# Altium PCB MiniDisplay.PcbDoc (part 1 of 2)
Units mil, origin at the board's own origin, x right, y up, seen from the top; angles counter-clockwise.
Board outline 1645.04 x 1210.04 mil, 2 copper layers (Top1, Bottom2), stack 42.17 mil thick; 71 components, 72 nets, 363 pads, 233 vias.
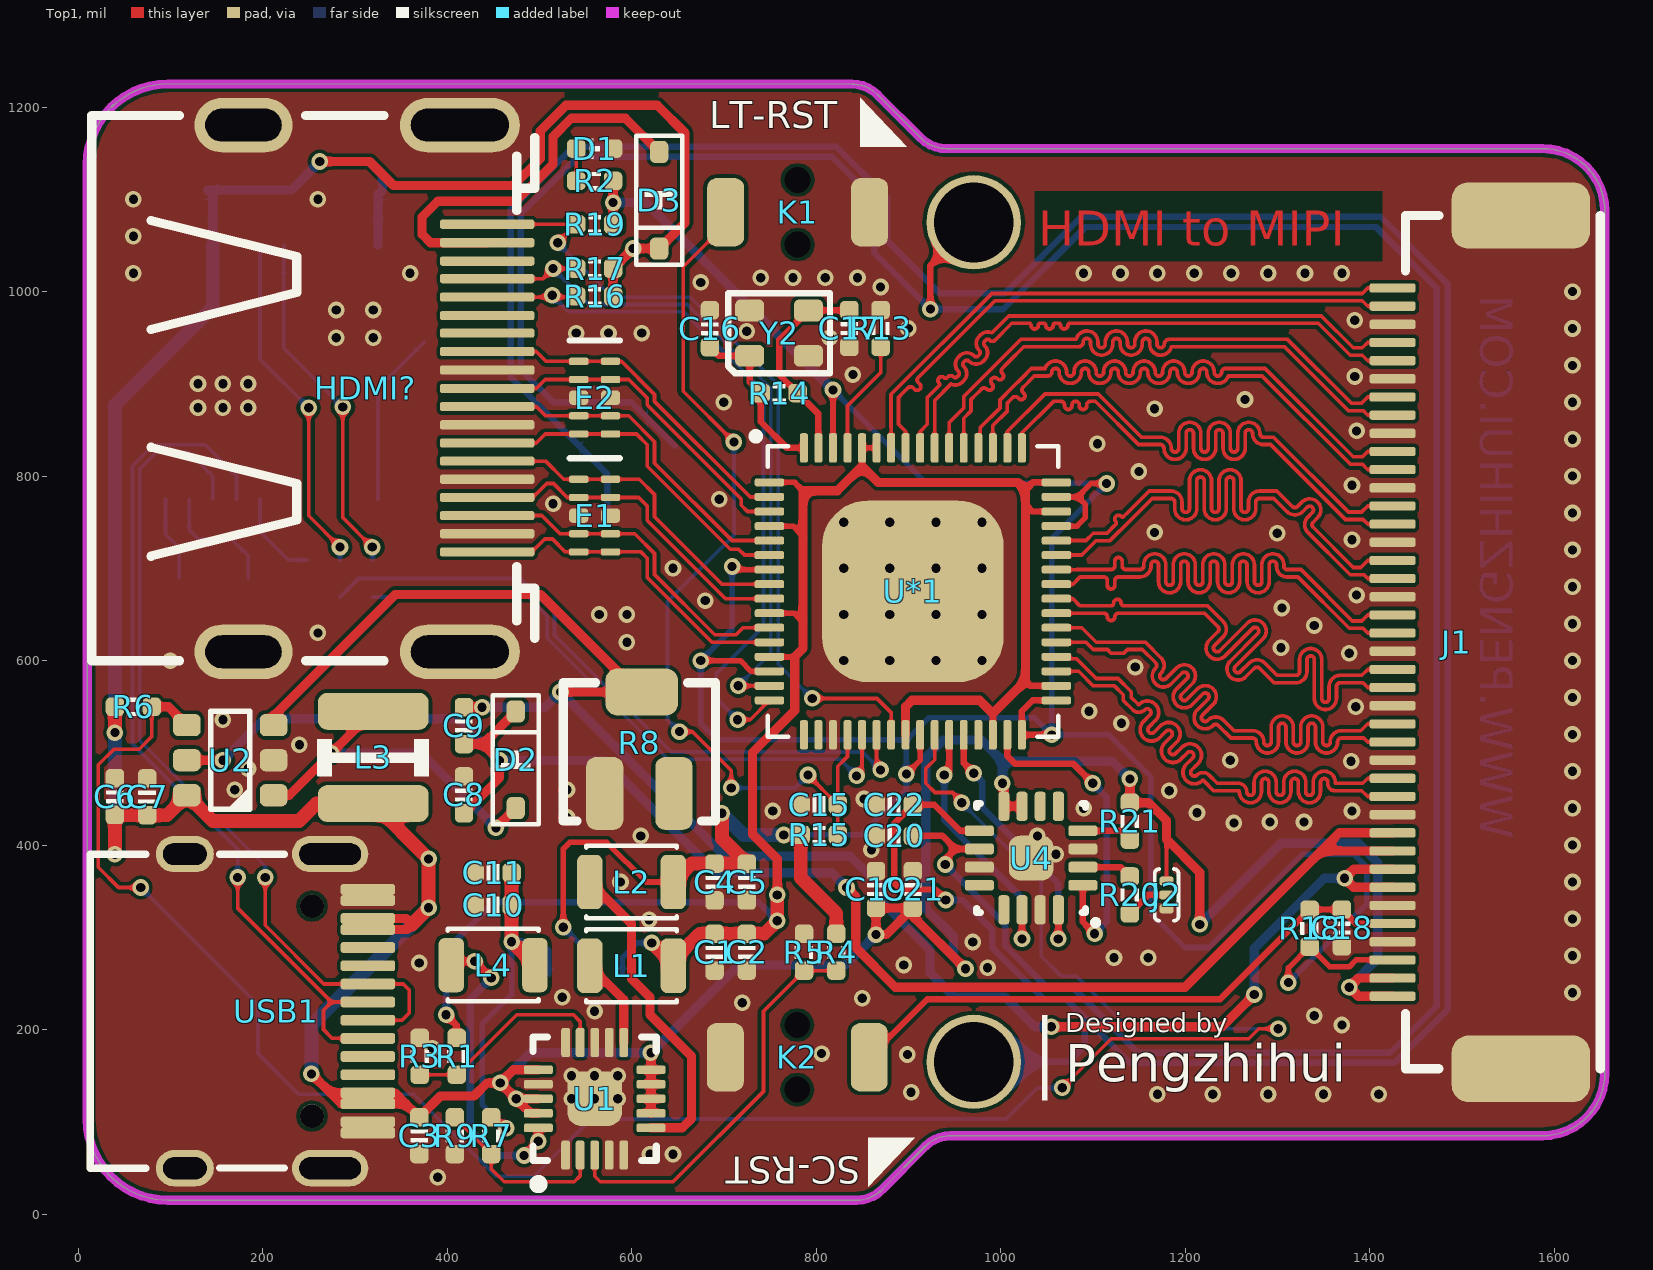
[diagram p0: Top1 view]
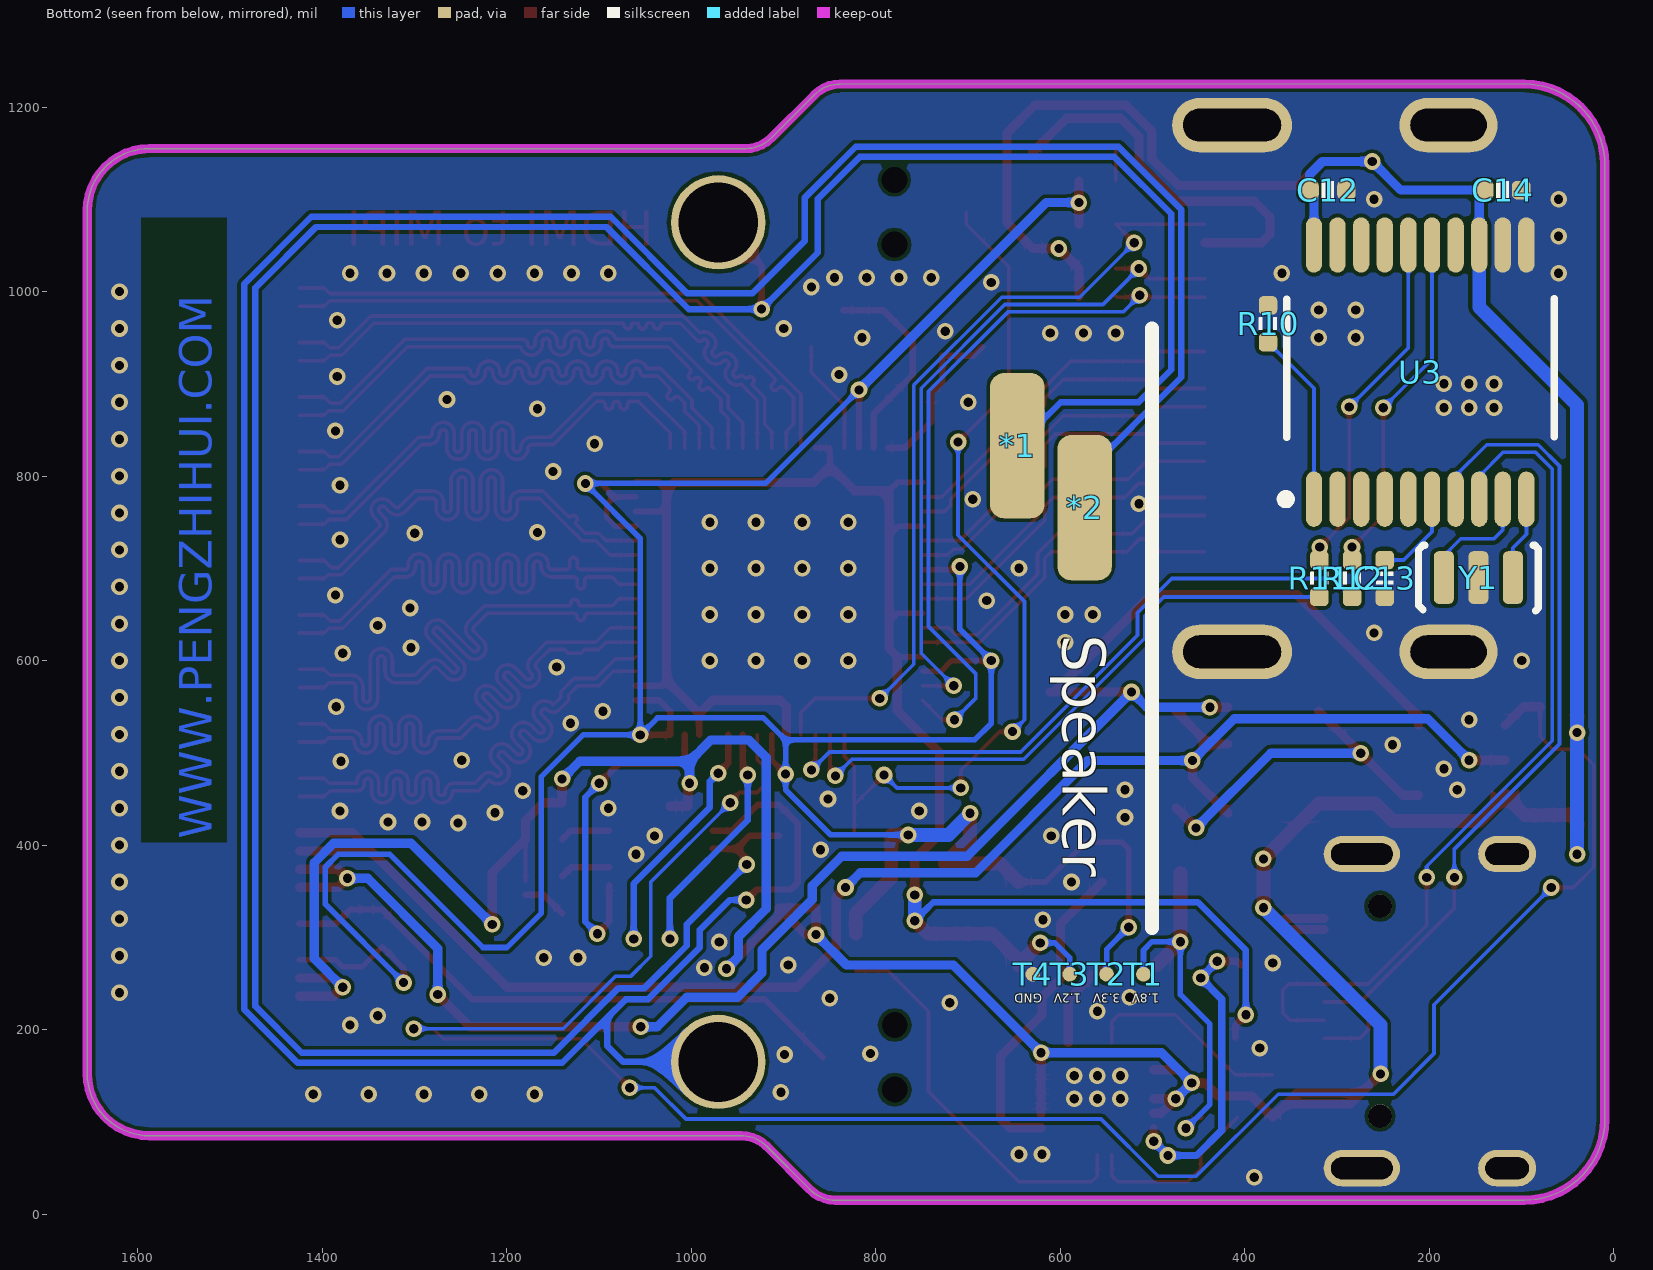
[diagram p1: Bottom2 view, seen from below]
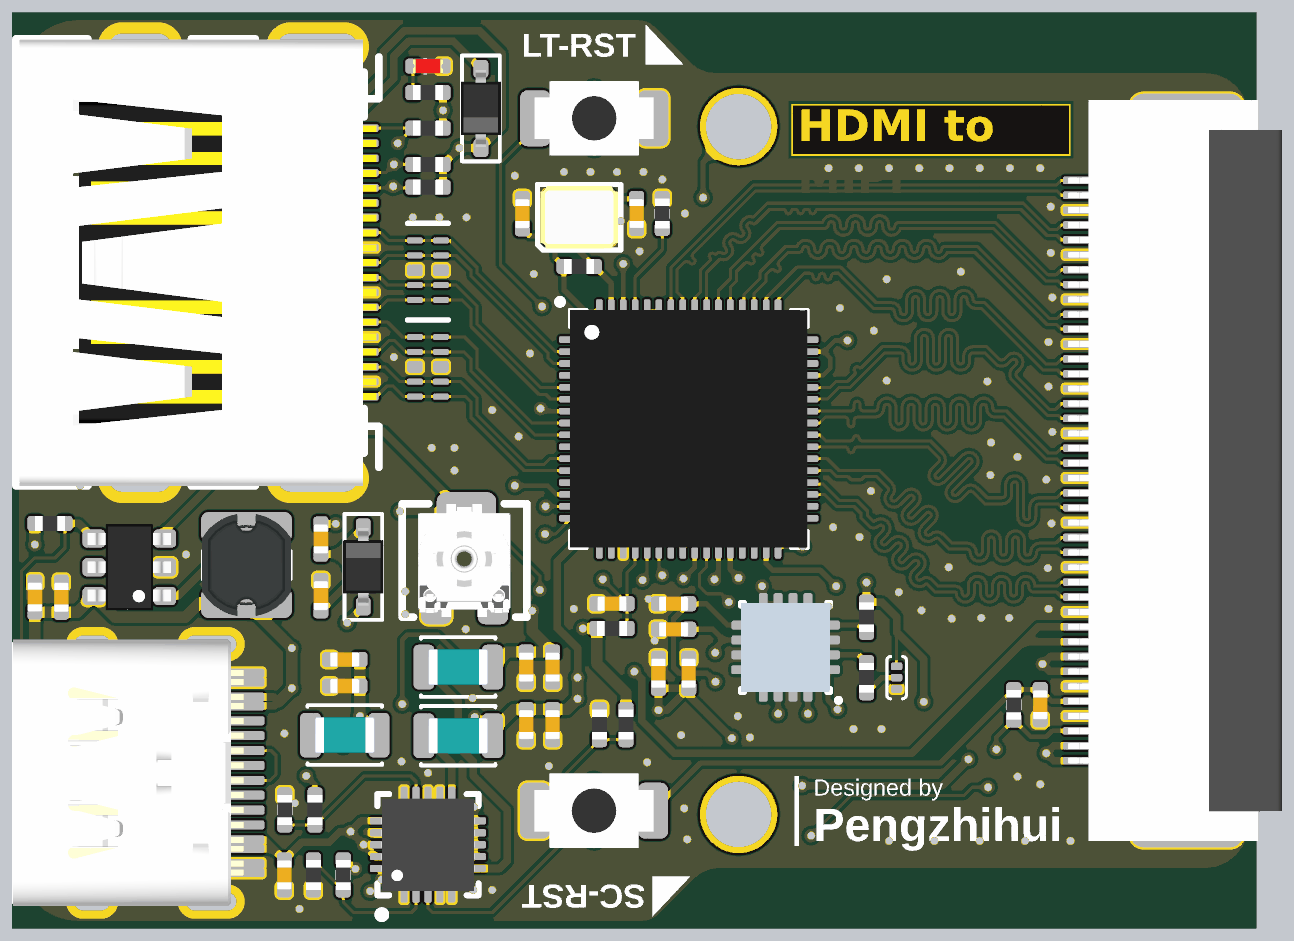
[diagram p3: 3D render of the assembled board from above, using the file's embedded part models]
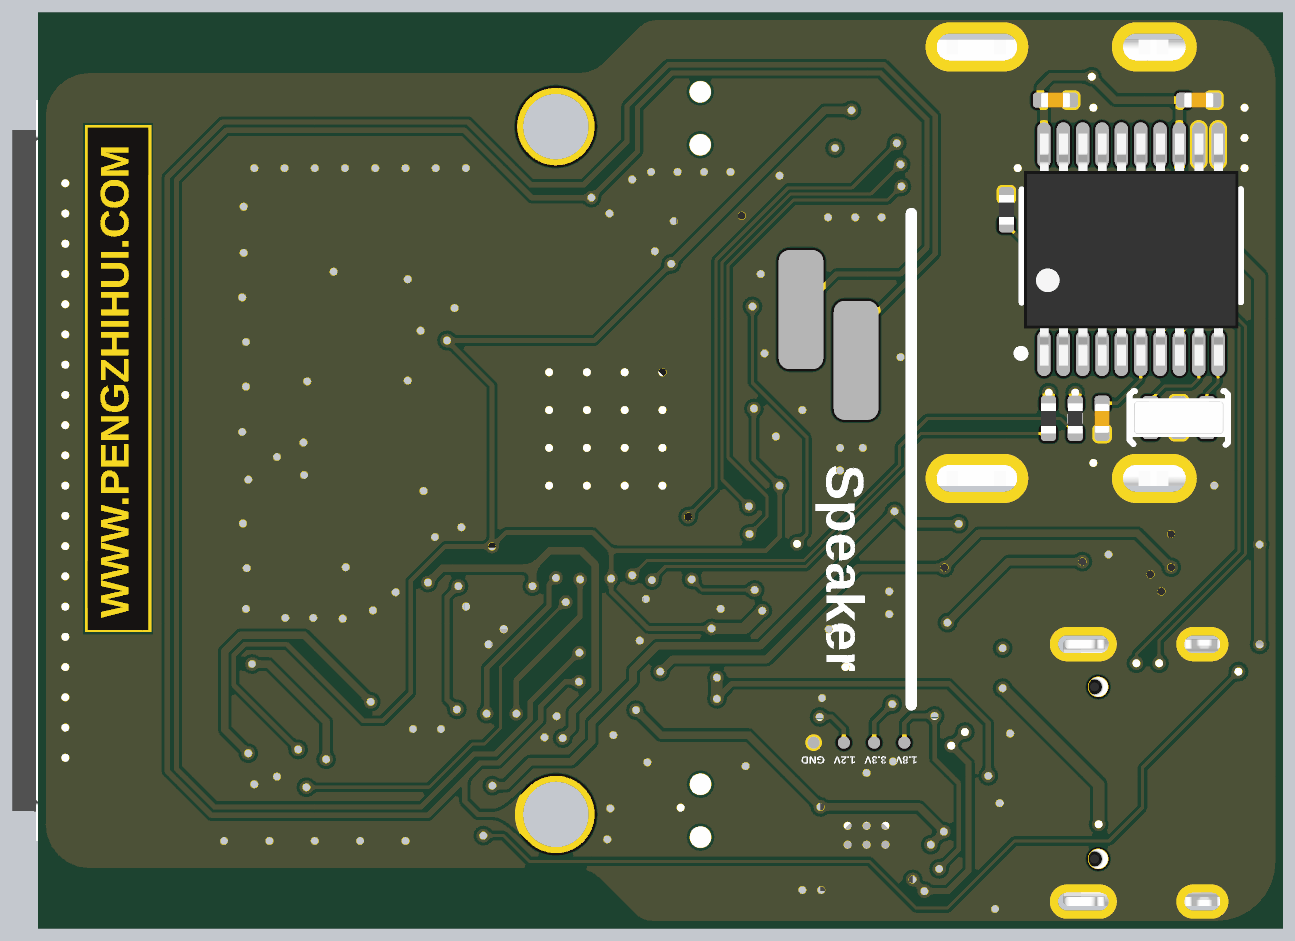
[diagram p4: 3D render of the assembled board from below, using the file's embedded part models]

## Layer stack, top to bottom
Top Solder: solder mask 0.4, Solder Resist, Dk 3.5
Top1: signal copper 1.4
Dielectric1: core 39.3701, FR-4, Dk 4.2
Bottom2: signal copper 1.4
Bottom Solder: solder mask 0.4, Solder Resist, Dk 3.5

## Board outline
9.96,102.54 ccw(c97.5,102.54) 97.5,15 843.73,15.04 ccw(c843.73,54.41) 871.57,26.57 918.47,73.47 cw(c946.31,45.63) 946.31,85 1587.57,84.97 ccw(c1587.57,152.4) 1655,152.4 1655,1087.63 ccw(c1587.66,1087.63) 1587.66,1154.97 941.31,1155 cw(c941.31,1194.37) 913.47,1166.53 866.53,1213.47 ccw(c838.69,1185.63) 838.69,1225 97.5,1225.04 ccw(c97.5,1137.5) 9.96,1137.5

## Design rules (kind name [scope] priority, off if disabled: settings)
Clearance [All] p1: gap=4 ignorepadtopadclearanceinfootprint=FALSE except(0: Arc-Hole Track-Hole SMDPad-Hole THPad-Hole Via-Hole Fill-Hole Poly-Hole Region-Hole Text-Hole)
ComponentClearance [All] p1: gap=0 collisioncheckmode=3 verticalgap=0 showdistances=FALSE
DiffPairsRouting [All] p1: maxlimit=9 minlimit=4 mostfreqgap=4 toplayer_minwidth=4 toplayer_maxwidth=15 toplayer_prefwidth=4 bottomlayer_minwidth=4 bottomlayer_maxwidth=15 bottomlayer_prefwidth=4 maxuncoupledlength=500
FanoutControl Fanout_BGA [All] p1: bgadir=Out bgaviamode=Centered fanoutstyle=Auto fanoutdirection=Alternating viagrid=1 // Fanout_BGA (Default Rule)
HoleSize [All] p1: absolutevalues=TRUE maxlimit=10000 minlimit=8 maxpercent=80.000 minpercent=20.000
MinimumSolderMaskSliver [All] p1 off: minsoldermaskwidth=2
PlaneClearance [All] p1: clearance=8
PlaneConnect [All] p1: planeconnectstyle=Direct reliefexpansion=20 reliefentries=4 reliefconductorwidth=10 reliefairgap=10
PolygonConnect [All] p1: connectstyle=Direct reliefconductorwidth=10 reliefentries=4 polygonreliefangle="90 Angle" airgapwidth=10
RoutingVias [All] p1: holewidth=8 width=16 viastyle="Through Hole" minholewidth=6 minwidth=12 maxholewidth=28 maxwidth=50
SilkToSilkClearance [All] p1: silktosilkclearance=0
SilkToSolderMaskClearance [IsPad] p1: minsilkscreentomaskgap=0 clearancetoexposedcopper=TRUE
SolderMaskExpansion [All] p1: expansion=3
Width GND [(InNet('AGND') OR InNet('GND'))] p1: maxlimit=50 minlimit=4 preferedwidth=10
Width VCC [(InNet('VDD_SYS_3.3V') OR InNet('VDD_AV_3.3V') OR InNet('VDD_5V') OR InNet('VDD1V2-SYS') OR InNet('VDD1V1-EPHY') OR InNet('VDD-CPUX') OR InNet('NetC15_2') OR InNet('NetC9_2') OR InNet('NetC12_2'))] p2: maxlimit=50 minlimit=4 preferedwidth=10
Width [All] p3: maxlimit=10000 minlimit=4 preferedwidth=4
21 further rules are at their usual default settings.

## Classes and differential pairs
component class U_Audio: *1 *2 C19 C20 C21 C22 J2 R20 R21 U4
net class MIPI: MIPI0_D0_N MIPI0_D0_P MIPI0_D1_N MIPI0_D1_P MIPI0_D2_N MIPI0_D2_P MIPI0_D3_N MIPI0_D3_P MIPI0_DC_N MIPI0_DC_P MIPI1_D0_N MIPI1_D0_P MIPI1_D1_N MIPI1_D1_P MIPI1_D2_N MIPI1_D2_P MIPI1_D3_N MIPI1_D3_P MIPI1_DC_N MIPI1_DC_P
net class HDMI: HDMIC_N HDMIC_P HDMID0_N HDMID0_P HDMID1_N HDMID1_P HDMID2_N HDMID2_P
component class U_Connector: C18 D3 E1 E2 HDMI? J1 R16 R17 R18 R19
component class LT6911C: C15 C16 C17 R13 R14 R15 U*1 Y2
component class Main: C1 C2 C3 C4 C5 C6 C7 C8 C9 C10 C11 C12 C13 C14 D1 D2 K1 K2 L1 L2 L3 L4 R1 R2 R3 R4 R5 R6 R7 R8 R9 R10 R11 R12 T1 T2 T3 T4 U1 U2 U3 USB1 Y1
differential pair MIPI1_DC: +MIPI1_DC_P -MIPI1_DC_N
differential pair MIPI1_D3: +MIPI1_D3_P -MIPI1_D3_N
differential pair MIPI1_D2: +MIPI1_D2_P -MIPI1_D2_N
differential pair MIPI1_D1: +MIPI1_D1_P -MIPI1_D1_N
differential pair MIPI1_D0: +MIPI1_D0_P -MIPI1_D0_N
differential pair MIPI0_DC: +MIPI0_DC_P -MIPI0_DC_N
differential pair MIPI0_D3: +MIPI0_D3_P -MIPI0_D3_N
differential pair MIPI0_D2: +MIPI0_D2_P -MIPI0_D2_N
differential pair MIPI0_D1: +MIPI0_D1_P -MIPI0_D1_N
differential pair MIPI0_D0: +MIPI0_D0_P -MIPI0_D0_N
differential pair HDMID2: +HDMID2_P -HDMID2_N
differential pair HDMID1: +HDMID1_P -HDMID1_N
differential pair HDMID0: +HDMID0_P -HDMID0_N
differential pair HDMIC: +HDMIC_P -HDMIC_N

## Components (designator, comment, footprint, x,y, rotation, side; value= is the part's Value field where it differs from the comment)
*1 "SPEAKER" SPEAKER 646.75,832.97 r180 bottom
*2 "SPEAKER" SPEAKER 573.9,765.8 r180 bottom
C1 "10uF" CAP_0402 690,283.9 r270 top value=0.1u
C2 "0.1uF" CAP_0402 725,283.9 r270 top value=0.1u
C3 "10uF" CAP_0402 370,85 r90 top value=0.1u
C4 "10uF" CAP_0402 690,360 r270 top value=0.1u
C5 "0.1uF" CAP_0402 725,360 r270 top value=0.1u
C6 "10uF" CAP_0402 40,452.68 r270 top value=0.1u
C7 "0.1uF" CAP_0402 75,452.36 r270 top value=0.1u
C8 "10uF" CAP_0402 418.38,454.5 r270 top value=0.1u
C9 "0.1uF" CAP_0402 418.38,529.5 r270 top value=0.1u
C10 "10uF" CAP_0402 450,335 r180 top value=0.1u
C11 "0.1uF" CAP_0402 450,370 r180 top value=0.1u
C12 "0.1uF" CAP_0402 310,1110 r180 bottom value=0.1u
C13 "10nF" CAP_0402 248.4,689 r270 bottom value=0.1u
C14 "0.1uF" CAP_0402 120.51,1110 r180 bottom value=0.1u
C15 "10uF" CAP_0402 803.5,443.8 r0 top value=0.1u
C16 "18pF" CAP_0402 685,959.8 r270 top value=0.1u
C17 "18pF" CAP_0402 836.1,960 r90 top value=0.1u
C18 "10uF" CAP_0402 1370,310.2 r90 top value=0.1u
C19 "10uF" CAP_0402 865,351.89 r270 top value=0.1u
C20 "220pF" CAP_0402 885,410 r180 top value=0.1u
C21 "0.1uF" CAP_0402 905,351.89 r270 top value=0.1u
C22 "220pF" CAP_0402 885,443.8 r180 top value=0.1u
D1 "color?" LED_0402_RED 560,1155 r0 top
D2 "二极管-5B5817WS" SOD-323 474.5,492.5 r90 top
D3 "二极管-5B5817WS" SOD-323 630,1099 r270 top
E1 "E?" DFN-2510 560,757.2 r270 top
E2 "E?" DFN-2510 560,885 r270 top
HDMI? "HDMI-SWM-19" HDMI-SWM-19 225,895 r90 top
J1 "0.5S_A_40PWB" FFC_0.5_40 1485,620 r90 top locked
J2 "Def-0" jumper-3 1180,346 r90 top
K1 "TACT 2P" ButtonTACT_3x4x2_180H 780,1086 r180 top value=3x4
K2 "TACT 2P" ButtonTACT_3x4x2_180H 779.69,170 r180 top value=3x4
L1 "2.2uH" 2520-L 600,269.21 r0 top
L2 "2.2uH" 2520-L 600,360 r0 top
L3 "CD32" IND_CD32 320,495 r90 top value=22uH
L4 "2.2uH" 2520-L 450,270 r0 top
R1 "100K" RES_0402 410.5,171.02 r90 top value=22R
R2 "1K" RES_0402 560,1120 r180 top value=22R
R3 "100K" RES_0402 370.5,171.02 r270 top value=22R
R4 "510K" RES_0402 822,283.9 r90 top value=22R
R5 "110K" RES_0402 787,283.9 r270 top value=22R
R6 "33K" RES_0402 60,550 r180 top value=22R
R7 "200K" RES_0402 448,85 r90 top value=22R
R8 "电位器-贴片" "贴片电位器 3*3" 616,526 r90 top
R9 "100K" RES_0402 408.5,85 r90 top value=22R
R10 "2K" RES_0402 375,965 r270 bottom value=22R
R11 "22R" RES_0402 319.4,689 r270 bottom
R12 "22R" RES_0402 283.9,689 r270 bottom
R13 "7.68K" RES_0402 870,960 r270 top value=22R
R14 "1M" RES_0402 760,890 r0 top value=22R
R15 "10K" RES_0402 803.5,411.12 r180 top value=22R
R16 "47K" RES_0402 560,995 r0 top value=22R
R17 "47K" RES_0402 560,1025 r0 top value=22R
R18 "10K" RES_0402 1335,310 r270 top value=22R
R19 "2.2K" RES_0402 560,1073 r180 top value=22R
R20 "0R" RES_0402 1140.23,346 r90 top value=22R
R21 "1M" RES_0402 1140.23,426 r270 top value=22R
T1 "测试点" TEST_PT 510,259.99 r180 bottom
T2 "测试点" TEST_PT 550,260 r180 bottom
T3 "测试点" TEST_PT 590,260 r180 bottom
T4 "测试点" TEST_PT 630,260 r180 bottom
U1 "EA3036" QFN-20 560,125 r90 top
U2 "RT9293" SOT23-6 165,492.05 r180 top
U3 "CH341T" SSOP-20 209.8,917.2 r90 bottom locked
U4 "MAX98357AETE" TQFN-16 1033.13,386 r180 top
U*1 "LT6911C" QFN-64-0.4mm 905,675 r0 top locked
USB1 "Type-C" Type-C-TOP 215,220 r180 top
Y1 "12MHz" 晶振-3P 147,690 r0 bottom
Y2 "27MHz" 晶振2520 760,955 r0 top

## Footprints (in the part's own frame and the unit in brackets; to place one, negate y for a bottom-side part, rotate by r counter-clockwise, add the part's x,y. Pads: shape width x height; smd on the part's side, far side on the other; paste and mask are expansions set on the pad)
2520-L [mm]
  rrect50% 0.7x1.5 smd: 1(-1.15,0) 2(1.15,0)
  silkscreen extent -1.25,-1 1.25,1, body extent -1,-0.6 1,0.6, height 0.92
ButtonTACT_3x4x2_180H [mil]
  round 0 hole 28: 0(0,35) 0(0,-35)
  rrect50% 40x74 smd: 1(-78,0) 2(78,0)
  body extent -79,-49 79,49, height 63
CAP_0402 [mil]
  rrect50% 20x20 smd: 1(-20,0) 2(20,0)
  silkscreen extent -7,-9 7,9, body extent -20,-10 20,10, height 20
DFN-2510 [mm]
  rrect50% 0.2x0.525 smd: 1(-1,-0.437) 2(-0.5,-0.437) 4(0.5,-0.437) 5(1,-0.437) 6(1,0.437) 7(0.5,0.437) 9(-0.5,0.437) 10(-1,0.437)
  rrect50% 0.4x0.525 smd: 3(0,-0.437) 8(0,0.437)
  silkscreen extent -1.57,-0.69 -1.57,0.69
FFC_0.5_40 [mil]
  rrect50% 72x150 smd: 0(-462.48,-78.98) 0(462.48,-78.98)
  rrect50% 10x50 smd: 1(-383.86,60) 2(-364.17,60) 3(-344.49,60) 4(-324.8,60) 5(-305.12,60) 6(-285.43,60) 7(-265.75,60) 8(-246.06,60) 9(-226.38,60) 10(-206.69,60) 11(-187.01,60) 12(-167.32,60) 13(-147.64,60) 14(-127.95,60) 15(-108.27,60) 16(-88.58,60) 17(-68.9,60) 18(-49.21,60) 19(-29.53,60) 20(-9.84,60) 21(9.84,60) 22(29.53,60) 23(49.21,60) 24(68.9,60) 25(88.58,60) 26(108.27,60) 27(127.95,60) 28(147.64,60) 29(167.32,60) 30(187.01,60) 31(206.69,60) 32(226.38,60) 33(246.06,60) 34(265.75,60) 35(285.43,60) 36(305.12,60) 37(324.8,60) 38(344.49,60) 39(364.17,60) 40(383.86,60)
  silkscreen extent -462,-165 462,46, body extent -490,-205 490,78, height 99
HDMI-SWM-19 [mm] "HDMI-SWM-19"
  rrect50% 0.254x2.6 smd: 1(-4.5,-5.55) 2(-4,-5.55) 3(-3.5,-5.55) 4(-3,-5.55) 5(-2.5,-5.55) 6(-2,-5.55) 7(-1.5,-5.55) 8(-1,-5.55) 9(-0.5,-5.55) 10(0,-5.55) 11(0.508,-5.55) 12(1.016,-5.55) 13(1.524,-5.55) 14(2.007,-5.55) 15(2.515,-5.55) 16(3.023,-5.55) 17(3.505,-5.55) 18(4.013,-5.55) 19(4.521,-5.55)
  oval 1.5x2.7 hole 2.1 slot 0.9 at 0 deg: SH1(-7.25,1.16) SH2(7.25,1.16)
  oval 1.5x3.3 hole 2.7 slot 0.9 at 0 deg: SH3(-7.25,-4.8) SH4(7.25,-4.8)
  silkscreen extent -7.5,-6.86 7.52,5.33, body extent -7.5,-6.78 7.5,5.22, height 6.14
IND_CD32 [mil]
  rrect50% 40x120 smd: 1(-50,0) 2(50,0)
  silkscreen extent -20,-60 20,60, body extent -68,-59 68,59, height 83
jumper-3 [mil] "选择焊盘"
  rrect50% 10x15 smd: 1(-15,0) 2(0,0) 3(15,0)
  silkscreen extent -28,-13 28,13
LED_0402_RED [mil]
  rrect50% 20x20 smd: 1(-20,0) 2(20,0)
  silkscreen extent -6,-10 6,10, body extent -20,-10 20,10, height 18
QFN-20 [mm] "QFN, 20-Leads, Body 3.00x3.00mm, Pitch 0.40mm, Thermal Pad 1.65x1.65mm, IPC Medium Density"
  rrect50% 0.8x0.24 smd: 1(-1.55,0.8) 2(-1.55,0.4) 3(-1.55,0) 4(-1.55,-0.4) 5(-1.55,-0.8) 11(1.55,-0.8) 12(1.55,-0.4) 13(1.55,0) 14(1.55,0.4) 15(1.55,0.8)
  rrect50% 0.24x0.8 smd: 6(-0.8,-1.55) 7(-0.4,-1.55) 8(0,-1.55) 9(0.4,-1.55) 10(0.8,-1.55) 16(0.8,1.55) 17(0.4,1.55) 18(0,1.55) 19(-0.4,1.55) 20(-0.8,1.55)
  rrect50% 1.5x1.5 smd: 21(0,0)
  silkscreen extent -2.47,-1.7 1.7,1.7, body extent -1.56,-1.56 1.56,1.56, height 0.8
QFN-64-0.4mm [mm]
  rrect50% 0.81x0.22 smd: 1(-3.95,3) 2(-3.95,2.6) 3(-3.95,2.2) 4(-3.95,1.8) 5(-3.95,1.4) 6(-3.95,1) 7(-3.95,0.6) 8(-3.95,0.2) 9(-3.95,-0.2) 10(-3.95,-0.6) 11(-3.95,-1) 12(-3.95,-1.4) 13(-3.95,-1.8) 14(-3.95,-2.2) 15(-3.95,-2.6) 16(-3.95,-3) 33(3.95,-3) 34(3.95,-2.6) 35(3.95,-2.2) 36(3.95,-1.8) 37(3.95,-1.4) 38(3.95,-1) 39(3.95,-0.6) 40(3.95,-0.2) 41(3.95,0.2) 42(3.95,0.6) 43(3.95,1) 44(3.95,1.4) 45(3.95,1.8) 46(3.95,2.2) 47(3.95,2.6) 48(3.95,3)
  rrect50% 0.22x0.81 smd: 17(-3,-3.95) 18(-2.6,-3.95) 19(-2.2,-3.95) 20(-1.8,-3.95) 21(-1.4,-3.95) 22(-1,-3.95) 23(-0.6,-3.95) 24(-0.2,-3.95) 25(0.2,-3.95) 26(0.6,-3.95) 27(1,-3.95) 28(1.4,-3.95) 29(1.8,-3.95) 30(2.2,-3.95) 31(2.6,-3.95) 32(3,-3.95) 49(3,3.95) 50(2.6,3.95) 51(2.2,3.95) 52(1.8,3.95) 53(1.4,3.95) 54(1,3.95) 55(0.6,3.95) 56(0.2,3.95) 57(-0.2,3.95) 58(-0.6,3.95) 59(-1,3.95) 60(-1.4,3.95) 61(-1.8,3.95) 62(-2.2,3.95) 63(-2.6,3.95) 64(-3,3.95)
  rrect50% 5x5 smd paste-4: 65(0,0)
  silkscreen extent -4.42,-4 4,4.37, body extent -4,-4 4,4, height 0.81
RES_0402 [mil]
  rrect50% 20x20 smd: 1(-20,0) 2(20,0)
  silkscreen extent -7,-10 7,10, body extent -20,-10 20,10, height 14
SOD-323 [mm]
  rrect50% 0.6x0.5 smd: 1(-1.329,0) 2(1.329,0)
  silkscreen extent -1.78,-0.64 1.78,0.64, body extent -1.3,-0.68 1.3,0.67, height 1.15
SOT23-6 [mil]
  rrect50% 30x24 smd: 1(-47,38) 2(-47,0) 3(-47,-38) 4(47,-38) 5(47,0) 6(47,38)
  silkscreen extent -21,-53 21,53, body extent -55,-57 55,57, height 57
SPEAKER [mm] "选择焊盘"
  rrect50% 1.5x4 smd: 1(0,0)
SSOP-20 [mil]
  oval 60x17.72 smd: 1(-142.2,115.43) 2(-142.2,89.84) 3(-142.2,64.25) 4(-142.2,38.66) 5(-142.2,13.07) 6(-142.2,-12.52) 7(-142.2,-38.11) 8(-142.2,-63.7) 9(-142.2,-89.29) 10(-142.2,-114.88) 11(133.39,-114.88) 12(133.39,-89.29) 13(133.39,-63.7) 14(133.39,-38.11) 15(133.39,-12.52) 16(133.39,13.07) 17(133.39,38.66) 18(133.39,64.25) 19(133.39,89.84) 20(133.39,115.43)
  silkscreen extent -147,-145 75,151, body extent -159,-142 149,142, height 75
TEST_PT [mil]
  rrect100% 16x16 smd: 0(0,0.01)
TQFN-16 [mm]
  rrect50% 0.8x0.3 smd paste+0 mask+0: 1(-1.425,0.75) 2(-1.425,0.25) 3(-1.425,-0.25) 4(-1.425,-0.75) 9(1.425,-0.75) 10(1.425,-0.25) 11(1.425,0.25) 12(1.425,0.75)
  rrect50% 0.3x0.8 smd paste+0 mask+0: 5(-0.75,-1.425) 6(-0.25,-1.425) 7(0.25,-1.425) 8(0.75,-1.425) 13(0.75,1.425) 14(0.25,1.425) 15(-0.25,1.425) 16(-0.75,1.425)
  rrect50% 1.23x1.23 smd paste+0 mask+0: 17(0,0)
  silkscreen extent -1.85,-1.5 1.5,1.85, body extent -1.92,-1.92 1.92,1.92, height 0.25
Type-C-TOP [mm]
  round 0.65 hole 0.65: 0(-0.98,2.89) 0(-0.98,-2.89)
  oval 1.6x1 hole 0.6 slot 1.2 at 0 deg: 1(2.52,4.325) 2(2.52,-4.325)
  oval 2.1x1 hole 0.6 slot 1.7 at 0 deg: 3(-1.48,-4.325) 4(-1.48,4.325)
  rrect50% 1.5x0.3 smd: A1(-2.52,-3.35) A4(-2.52,-2.55) A5(-2.52,-1.25) A6(-2.52,-0.25) A7(-2.52,0.25) A8(-2.52,1.25) A9(-2.52,2.55) A12(-2.52,3.35) B1(-2.52,3.05) B4(-2.52,2.25) B5(-2.52,1.75) B6(-2.52,0.75) B7(-2.52,-0.75) B8(-2.52,-1.75) B9(-2.52,-2.25) B12(-2.52,-3.05)
  silkscreen extent -0.22,-4.33 5.12,4.33, body extent -2.57,-4.48 5.18,4.48, height 3.26
晶振2520 [mm]
  rrect50% 0.8x0.6 smd: 1(-0.81,-0.625) 2(0.81,-0.625) 3(0.81,0.625) 4(-0.81,0.625)
  silkscreen extent -1.4,-1.1 1.4,1.1, body extent -1.3,-1.05 1.3,1.05, height 0.55
晶振-3P [mm] "贴片晶振"
  rrect50% 0.55x1.45 smd: 1(-0.95,0) 2(0,0) 3(0.95,0)
  silkscreen extent -1.65,-0.89 1.65,0.91, body extent -1.65,-0.89 1.65,0.89, height 0.8
"贴片电位器 3*3" [mil]
  rrect50% 78.74x40.18 smd: 1(-70,45) 2(-70,-30)
  rrect50% 50.74x78.74 smd: 3(40,5)
  silkscreen extent -100,-75 50,90, body extent -100,-53 50,69, height 64

## Part data
C1 C2 C3 C4 C5 C6 C7 C8 C9 C10 C11 C12 C13 C14 C15 C16 C17 C18 C19 C20 C21 C22: library part 电容-0402, "Capacitor"
D1: library part LED_0402, "LED", Type=0402
D2 D3: "40V"
E1 E2: library part AZ1045-04F
HDMI?: library part HDMI-MC34931HDMI-SWM-19
J1: library part FPC40-0.5mm, "Header, 40-Pin", LatestRevisionDate=17-Jul-2002, LatestRevisionNote="Re-released for DXP Platform.", Publisher="Altium Limited"
J2: library part 选择跳线, "Resistor", LatestRevisionDate=17-Jul-2002, LatestRevisionNote="Re-released for DXP Platform.", PackageDescription="Axial Device, Thru-Hole; 2 Leads; 0.4 in Pin Spacing", PackageReference=AXIAL-0.4, Published=8-Jun-2000, Publisher="Altium Limited"
K1 K2: library part ButtonTACT_3x4x2_180, "Button", Type="TACT 2P"
L1 L2 L4: library part 电感-2520, "磁珠"
L3: library part Ind_CD32, "Inductor", Specification="±5% 100mA", Type=CD32
R1 R2 R3 R4 R5 R6 R7 R9 R10 R11 R12 R13 R14 R15 R16 R17 R18 R19 R20 R21: library part 电阻-0402, "Resistor"
U1: "EA3036 is a 3CH power management IC for applications powered by one Li-Ion battery or a DC 5V adapter."
U2: "LCD-LED Driver"
U4: "IC Amplifier IC 2-Channel (Stereo) Class D 16-TQFN (3x3)", Digikey Part Number=MAX98357AETE+T-ND, Manufacturer="Maxim Electronics", Mfg Package Ident=21-0896, Mouser Part Number=700-MAX98357AETE+T, Part Number=MAX98357AETE+T, Temperature="+40¡ãC to +85¡", Temperature Range High=+85°C, Temperature Range Low=+40°C, ComponentLink1Description=Upverter, ComponentLink1URL=https://upverter.com/upn/revision/0f54a4b5bdb80fd2/, ComponentLink2Description=Datasheet, ComponentLink2URL=http://datasheets.maximintegrated.com/en/ds/MAX98357A-MAX98357B.pdf, Digikey Description="IC Amplifier IC 2-Channel (Stereo) Class D 16-TQFN (3x3)", helpURL=https://upverter.com/upn/revision/0f54a4b5bdb80fd2/, Lead Free=yes, Package=21-0896, Price=1.00367999051, RoHS=TRUE, Supplier 1=Digi-Key, Supplier 2=Mouser, Supplier Part Number 1=MAX98357AETE+T-ND, Supplier Part Number 2=700-MAX98357AETE+T
U*1: "HDMI to MIPI PHY"
USB1: library part USB-Type-C-TOP
Y1: library part 晶振-3Pin, "村田贴片"
Y2: library part 晶振-4Pin-无源, "2520无源", Package="SMD-6 ECS International", Availability=Unavailable, MF="ECS International", MP=ECS-3225S30-240-EN-TR, Price="0.75 USD"
R8: ComponentLink1Description="Manufacturer Link", ComponentLink1URL=http://bourns.com/2/search.html, DatasheetVersion=Oct-2003, PackageDescription="Square Trimming Potentiometer", PackageReference=POT4MM-2, Published=17-Dec-2003, Publisher="Altium Limited"

## Free pads (board coordinates)
  round 102.36 hole 86.61: ""(971,165) ""(971,1075)

## Via types
v1: diameter 18, hole 10, Top1 to Bottom2, tented both sides, 233 vias

## Nets (pads, with @x,y where several pads share a name; then routed paths per layer and width w, separated by ;. In a path a pad name is that pad's centre, name@x,y a point inside that pad or via, vN(x,y) a via of type N, cw(c..) or ccw(c..) an arc to the next point about the centre after c; other vN are vias at no path point)
27M_CLK_IN: C16.2 R14.1 U*1.64 Y2.1 | length 182
  Top1 w7: C16.2@685,939.8 694.41,930.39 Y2.1@728.11,930.39 728.11,901.89 R14.1@740,890 740,859 768.49,830.51 U*1.64@786.89,830.51
27M_CLK_OUT: C17.2 R14.2 U*1.63 Y2.3 | length 223.8
  Top1 w7: U*1.63@802.64,830.51 802.64,867.36 R14.2@780,890 760,910 760,947.72 Y2.3@791.89,979.61 C17.2@835.71,979.61
GND: C1.2 C2.2 C3.1 C4.2 C5.2 C6.1 C7.1 C8.1 C10.2 C11.2 C12.2 C13.2 C14.2 C15.1 C16.1 C17.1 C18.1 C19.1 C20.2 C21.1 C22.2 D1.2 E1.3 E1.8 E2.3 E2.8 HDMI?.2 HDMI?.5 HDMI?.8 HDMI?.11 HDMI?.SH1 HDMI?.SH2 HDMI?.SH3 HDMI?.SH4 J1.0 J1.4 J1.6 J1.11 J1.14 J1.17 J1.20 J1.23 J1.26 J1.29 J1.32 J1.35 J1.38 J2.1 K1.1 K2.2 R3.1 R5.1 R8.1 R9.1 R10.1 R13.1 T4.0 U1.1 U1.4 U1.5 U1.12 U1.13 U1.15 U1.17 U1.21 U2.2 U3.11 U3.12 U4.3 U4.11 U4.15 U4.17 U*1.19 U*1.65 USB1.1 USB1.2 USB1.3 USB1.4 USB1.A1 USB1.A12 USB1.B1 USB1.B12 Y1.2 Y2.2 Y2.4
  other v1: 390,40 620,65 645,65 535,125 560,125 585,125 1170,130 1230,130 1290,130 1350,130 1410,130 903,132 535,150 560,150 585,150 899,173 806,174 383.98,180 1370,205 1340,215 560,220 720,229 850,234 525,235 1620,240 986,267 895,270 370,272.17 1123,278 1160,278 1620,280 970,295 619,319 1620,320 588,360 1620,360 1060,390 860,395 1620,400 610,410 1040,410 1253,424 1292,425 1329,425 530,430 1213,435 753,437 1381,437 1090,440 1620,440 852,450 1183,459 170,460 530,460 1620,480 184.4,482.68 1380,491 1249,492 240,508.9 1620,520 1131,532 157.05,536 1096,545 1385,550 1620,560 1146,593 100,600 830,600 880,600 930,600 980,600 1620,600 1378,608 1304,614 595,620 260,630 1340,638 1620,640 565,650 595,650 830,650 880,650 930,650 980,650 1305,657 680,665 1386,671 1620,680 645,700 830,700 880,700 930,700 980,700 1620,720 1381,731 1300,738 1167,739 830,750 880,750 930,750 980,750 1620,760 515,770 695,775 1381,790 1620,800 1150,805 1105,835 1620,840 1386,849 1167,873 130,874 157.05,874 184.4,874 700,880 1620,880 1265,883 130,900 157.05,900 184.4,900 1384,908 840,910 1620,920 280,950 320,950 815,950 540,955 575,955 611,955 725,957 900,960 1620,960 1384,969 280,980 320,980 1620,1000 870,1005 675,1010 740,1015 775,1015 810,1015 845,1015 60,1020 360,1020 1090,1020 1130,1020 1170,1020 1210,1020 1250,1020 1290,1020 1330,1020 1370,1020 60,1060 60,1100 260,1100
HDMI_5V_DET: R6.1 U2.4 U*1.26 | length 2371.7
  Top1 w4: v1(68,354) 44,354 22,376 22,487 39,504 66.27,504 80,517.73 R6.1@80,550 ; U*1.26@928.62,519.49 928.62,492.62 919,483 919,467 929,457 948,457 958,447 v1(958,446) ; v1(1067,137) 1120,190 1269,190 1280,201 v1(1301,201)
  Top1 w10: R6.1@80,550 98.05,550 U2.4@118,530.05
  Bottom2 w4: v1(68,354) 195,227 195,174 239,130 364,130 453,41 494,41 556,103 1006,103 1040,137 v1(1067,137) ; v1(958,446) 1044,360 1044,279.51 1065.51,258 1082,258 1139,201 v1(1301,201)
HDMIC_N: E2.1 E2.10 HDMI?.12 U*1.2 | length 375.6
  Top1 w4: HDMI?.12@443.5,935 496.69,935 507.31,924.37 E2.1@542.78,924.37 E2.10@577.22,924.37 589.01,924.37 625,888.38 625,881 728.64,777.36 U*1.2@749.49,777.36
HDMIC_P: E2.2 E2.9 HDMI?.10 U*1.3 | length 377.6
  Top1 w4: HDMI?.10@443.5,895 496.69,895 506.37,904.69 E2.2@542.78,904.69 E2.9@577.22,904.69 597.03,904.69 617,884.71 617,877.2 719,775.2 719,768.44 725.83,761.61 U*1.3@749.49,761.61
HDMID0_N: E2.4 E2.7 HDMI?.9 U*1.5 | length 379.8
  Top1 w4: HDMI?.9@443.5,875.32 496.69,875.32 506.69,865.32 E2.4@542.78,865.32 E2.7@577.22,865.32 597,865.32 625,837.31 625,814 708.88,730.12 U*1.5@749.49,730.12
HDMID0_P: E2.5 E2.6 HDMI?.7 U*1.6 | length 378
  Top1 w4: HDMI?.7@443.5,835.94 496.69,835.94 506.37,845.63 E2.5@542.78,845.63 E2.6@577.22,845.63 605.37,845.63 617,834 617,810.69 706.91,720.77 716,720.77 722.4,714.37 U*1.6@749.49,714.37
HDMID1_N: E1.1 E1.10 HDMI?.6 U*1.8 | length 375.3
  Top1 w4: HDMI?.6@443.5,816.26 506.75,816.26 526.43,796.57 E1.1@542.78,796.57 E1.10@577.22,796.57 608.43,796.57 625,780 625,756 698.13,682.87 U*1.8@749.49,682.87
HDMID1_P: E1.2 E1.9 HDMI?.4 U*1.9 | length 373.2
  Top1 w4: HDMI?.4@443.5,776.89 492.89,776.89 508,792 515.33,792 530.44,776.89 E1.2@542.78,776.89 E1.9@577.22,776.89 607.8,776.89 617,767.69 617,752 701.87,667.13 U*1.9@749.49,667.13
HDMID2_N: E1.4 E1.7 HDMI?.3 U*1.11 | length 376
  Top1 w4: HDMI?.3@443.5,757.2 502.8,757.2 522.48,737.52 E1.4@542.78,737.52 E1.7@577.22,737.52 603.48,737.52 625,716 625,693.31 690.31,628 713.12,628 720.75,635.63 U*1.11@749.49,635.63
HDMID2_P: E1.5 E1.6 HDMI?.1 U*1.12 | length 370.4
  Top1 w4: HDMI?.1@443.5,717.83 491.91,717.83 505.81,731.73 514.27,731.73 528.17,717.83 E1.5@542.78,717.83 E1.6@577.22,717.83 610.17,717.83 617,711 617,690 687.12,619.88 U*1.12@749.49,619.88
HPD: HDMI?.19 R19.2 U*1.23 | length 898.6
  Top1 w4: HDMI?.19@443.5,1073 R19.2@540,1073 v1(520,1053) ; v1(796,559) 866.1,559 881.38,543.72 U*1.23@881.38,519.49
  Bottom2 w4: v1(520,1053) 579,994 663.63,994 759,898.63 759,596 v1(796,559)
MIPI0_D0_N: J1.28 U*1.50 | length 653.3
  Top1 w4: U*1.50@1007.36,830.51 1007.36,848.23 1048.14,889 1106,889 1152.8,842.2 1173.14,842.2 cw(c1173.14,830.2) 1185.14,830.2 ; 1185.14,830.07 ccw(c1189.14,830.07) 1193.14,830.07 1193.14,846.33 cw(c1205.14,846.33) 1217.14,846.33 1217.14,830.07 ccw(c1221.14,830.07) 1225.14,830.07 1225.14,846.33 cw(c1237.14,846.33) 1249.14,846.33 1249.14,830.07 ccw(c1253.14,830.07) 1257.14,830.07 1257.14,846.33 cw(c1269.14,846.33) 1281.14,846.33 ; 1281.14,846.2 ccw(c1285.14,846.2) 1285.14,842.2 1295.91,842.2 1377.11,761 1391.36,761 1398,767.64 J1.28@1425,767.64
MIPI0_D0_P: J1.27 U*1.49 | length 654.1
  Top1 w4: U*1.49@1023.11,830.51 1023.11,846.71 1057.4,881 1061.4,881 1065.4,881 cw(c1065.4,877) 1069.4,877 1069.4,876.2 ccw(c1073.4,876.2) 1073.4,872.2 ccw(c1073.4,876.2) 1077.4,876.2 1077.4,877 cw(c1081.4,877) 1081.4,881 cw(c1081.4,877) 1085.4,877 1085.4,876.2 ccw(c1089.4,876.2) 1089.4,872.2 ccw(c1089.4,876.2) 1093.4,876.2 1093.4,877 cw(c1097.4,877) 1097.4,881 1101.4,881 1102.69,881 1103.17,880.51 1149.49,834.2 1173.14,834.2 cw(c1173.14,830.2) 1177.14,830.2 ; 1177.14,830.07 ccw(c1189.14,830.07) 1201.14,830.07 1201.14,846.33 cw(c1205.14,846.33) 1209.14,846.33 1209.14,830.07 ccw(c1221.14,830.07) 1233.14,830.07 1233.14,846.33 cw(c1237.14,846.33) 1241.14,846.33 1241.14,830.07 ccw(c1253.14,830.07) 1265.14,830.07 1265.14,846.33 cw(c1269.14,846.33) 1273.14,846.33 ; 1273.14,846.2 ccw(c1285.14,846.2) 1285.14,834.2 1292.6,834.2 1373.8,753 1392.95,753 1398,747.95 J1.27@1425,747.95
MIPI0_D1_N: J1.31 U*1.52 | length 652.2
  Top1 w4: U*1.52@975.87,830.51 977.87,832.51 977.87,852.28 999.43,873.84 999.43,882.63 1012.5,895.7 1023.7,906.9 1033.4,916.6 1048.24,916.6 cw(c1059.6,912.73) 1071.6,912.73 ; 1071.6,912.47 ccw(c1075.6,912.47) 1079.6,912.47 ; 1079.6,912.73 cw(c1091.6,912.73) 1103.6,912.73 ; 1103.6,912.47 ccw(c1107.6,912.47) 1111.6,912.47 ; 1111.6,912.73 cw(c1123.6,912.73) 1135.6,912.73 ; 1135.6,912.47 ccw(c1139.6,912.47) 1143.6,912.47 ; 1143.6,912.73 cw(c1155.6,912.73) 1167.6,912.73 ; 1167.6,912.47 ccw(c1171.6,912.47) 1175.6,912.47 ; 1175.6,912.73 cw(c1187.6,912.73) 1199.6,912.73 ; 1199.6,912.47 ccw(c1203.6,912.47) 1207.6,912.47 ; 1207.6,912.73 cw(c1219.6,912.73) 1231.6,912.73 ; 1231.6,912.47 ccw(c1235.6,912.47) 1239.6,912.47 ; 1239.6,912.47 cw(c1243.6,912.6) 1243.6,916.6 1286.71,916.6 1382.31,821 1392.31,821 1398,826.69 J1.31@1425,826.69
MIPI0_D1_P: J1.30 U*1.51 | length 647.3
  Top1 w4: U*1.51@991.61,830.51 991.61,854.72 1007.43,870.53 1007.43,879.31 1010.25,882.14 1013.08,884.97 cw(c1015.91,882.14) 1018.74,884.97 1019.61,884.1 ccw(c1022.44,886.92) 1025.27,884.1 ccw(c1022.44,886.92) 1025.27,889.75 1024.4,890.63 cw(c1027.22,893.45) 1024.4,896.28 1027.22,899.11 1032.88,904.77 1034.46,906.34 1036.71,908.6 1051.6,908.6 ccw(c1051.6,912.6) 1055.6,912.6 ; 1055.6,912.73 cw(c1059.6,912.73) 1063.6,912.73 ; 1063.6,912.47 ccw(c1075.6,912.47) 1087.6,912.47 ; 1087.6,912.73 cw(c1091.6,912.73) 1095.6,912.73 ; 1095.6,912.47 ccw(c1107.6,912.47) 1119.6,912.47 ; 1119.6,912.73 cw(c1123.6,912.73) 1127.6,912.73 ; 1127.6,912.47 ccw(c1139.6,912.47) 1151.6,912.47 ; 1151.6,912.73 cw(c1155.6,912.73) 1159.6,912.73 ; 1159.6,912.47 ccw(c1171.6,912.47) 1183.6,912.47 ; 1183.6,912.73 cw(c1187.6,912.73) 1191.6,912.73 ; 1191.6,912.47 ccw(c1203.6,912.47) 1215.6,912.47 ; 1215.6,912.73 cw(c1219.6,912.73) 1223.6,912.73 ; 1223.6,912.47 ccw(c1235.6,912.47) 1246.96,908.6 1283.4,908.6 1379,813 1392.01,813 1398,807.01 J1.30@1425,807.01
MIPI0_D2_N: J1.37 U*1.56 | length 654.2
  Top1 w4: U*1.56@912.87,830.51 912.87,848.46 920.69,856.27 920.69,885.31 923.51,888.14 929.17,893.8 933.32,897.95 ccw(c931.81,899.46) 933.32,900.96 cw(c936.15,903.79) 933.32,906.62 cw(c936.15,903.79) 938.98,906.62 ccw(c940.48,908.13) 941.99,906.62 943.07,907.7 cw(c945.9,904.87) 948.74,907.69 ccw(c950.94,909.91) 953.16,907.7 954.38,908.93 ccw(c952.17,911.14) 955.3,911.14 ccw(c952.17,911.14) 954.38,913.36 cw(c962.26,921.23) 954.38,929.1 955.61,930.33 cw(c963.48,922.45) 971.35,930.33 ccw(c973.57,932.54) 975.78,930.33 977.01,931.55 ccw(c974.8,933.77) 977.93,933.77 ccw(c974.8,933.77) 977.01,935.98 cw(c984.88,943.85) 977.01,951.73 978.24,952.95 cw(c986.11,945.08) 990.63,955.26 1008.97,973.6 1347.71,973.6 1382.31,939 1392.2,939 1398,944.8 J1.37@1425,944.8
MIPI0_D2_P: J1.36 U*1.55 | length 651.7
  Top1 w4: U*1.55@928.62,830.51 928.62,852.89 928.69,852.95 928.69,882 946.42,899.74 ccw(c950.94,909.91) 958.81,902.04 960.04,903.27 ccw(c952.17,911.14) 963.3,911.14 ccw(c952.17,911.14) 960.04,919.01 cw(c962.26,921.23) 960.04,923.44 961.27,924.67 cw(c963.48,922.45) 965.7,924.67 ccw(c973.57,932.54) 981.44,924.67 982.67,925.9 ccw(c974.8,933.77) 985.93,933.77 ccw(c974.8,933.77) 982.67,941.64 cw(c984.88,943.85) 982.67,946.07 983.9,947.3 cw(c986.11,945.08) 988.32,947.3 ccw(c991.15,950.12) 993.98,947.3 1012.29,965.6 1021,965.6 1025,965.6 1030.87,965.6 cw(c1030.87,963.47) 1033,963.47 ccw(c1037,963.47) 1037,959.47 ccw(c1037,963.47) 1041,963.47 cw(c1043.13,963.47) 1043.13,965.6 1046.87,965.6 cw(c1046.87,963.47) 1049,963.47 ccw(c1053,963.47) 1053,959.47 ccw(c1053,963.47) 1057,963.47 cw(c1059.13,963.47) 1059.13,965.6 1062.87,965.6 cw(c1062.87,963.47) 1065,963.47 ccw(c1069,963.47) 1069,959.47 ccw(c1069,963.47) 1073,963.47 cw(c1075.13,963.47) 1075.13,965.6 1076.8,965.6 1344.4,965.6 1379,931 1392.12,931 1398,925.12 J1.36@1425,925.12
MIPI0_D3_N: J1.40 U*1.58 | length 649.6
  Top1 w4: U*1.58@881.38,830.51 881.38,852.89 881.32,852.95 881.32,888.63 990.69,998 1392.14,998 1398,1003.86 J1.40@1425,1003.86
MIPI0_D3_P: J1.39 U*1.57 | length 653.2
  Top1 w4: U*1.57@897.13,830.51 897.13,848.46 889.32,856.27 889.32,885.31 894,890 896.83,892.83 899.66,895.66 cw(c902.49,892.83) 905.31,895.66 906.82,894.15 ccw(c909.65,896.98) 912.48,894.15 ccw(c909.65,896.98) 912.48,899.81 910.5,901.78 cw(c912.86,904.14) 910.5,906.5 994,990 1392.17,990 1398,984.17 J1.39@1425,984.17
MIPI0_DC_N: J1.34 U*1.54 | length 650.8
  Top1 w4: U*1.54@944.37,830.51 944.37,858.16 960.06,873.84 960.06,886.31 1001.47,927.73 1018.07,944.33 1021.94,948.2 1081.95,948.2 cw(c1093.6,945.33) 1105.6,945.33 1105.6,943.07 ccw(c1109.6,943.07) 1113.6,943.07 1113.6,945.33 cw(c1125.6,945.33) 1137.6,945.33 1137.6,943.07 ccw(c1141.6,943.07) 1145.6,943.07 1145.6,945.33 cw(c1157.6,945.33) 1169.6,945.33 1169.6,943.07 ccw(c1173.6,943.07) 1177.6,943.07 cw(c1182.73,943.07) 1182.73,948.2 1311.11,948.2 1380.31,879 1391.25,879 1398,885.75 J1.34@1425,885.75
MIPI0_DC_P: J1.33 U*1.53 | length 652.4
  Top1 w4: U*1.53@960.12,830.51 960.12,862.59 968.06,870.53 968.06,883 973.73,888.67 976.56,891.5 979.38,894.33 cw(c982.21,891.5) 985.04,894.33 985.13,894.24 ccw(c987.96,897.06) 990.79,894.24 ccw(c987.96,897.06) 990.79,899.89 990.7,899.99 cw(c993.53,902.81) 990.7,905.64 cw(c993.53,902.81) 996.35,905.64 996.45,905.55 ccw(c999.28,908.38) 1002.11,905.55 ccw(c999.28,908.38) 1002.11,911.21 1002.01,911.3 cw(c1004.84,914.13) 1002.01,916.96 1004.84,919.79 1008.63,923.57 1025.26,940.2 1084.47,940.2 ccw(c1084.47,945.33) 1089.6,945.33 cw(c1093.6,945.33) 1097.6,945.33 1097.6,943.07 ccw(c1109.6,943.07) 1121.6,943.07 1121.6,945.33 cw(c1125.6,945.33) 1129.6,945.33 1129.6,943.07 ccw(c1141.6,943.07) 1153.6,943.07 1153.6,945.33 cw(c1157.6,945.33) 1161.6,945.33 1161.6,943.07 ccw(c1173.6,943.07) 1185.25,940.2 1307.8,940.2 1377,871 1393.06,871 1398,866.06 J1.33@1425,866.06
MIPI1_D0_N: J1.13 U*1.36 | length 650.6
  Top1 w4: U*1.36@1060.51,604.13 1062.51,602.13 1082.28,602.13 1103.84,580.57 1127.43,580.57 1141.8,566.2 1141.8,560 1149.23,552.57 ccw(c1149.73,553.07) 1150.23,552.57 cw(c1159.01,543.79) 1167.8,552.57 cw(c1159.01,543.79) 1171.44,543.79 cw(c1159.01,543.79) 1167.8,535 1160.85,528.05 ; 1160.84,522.39 cw(c1163.67,525.22) 1160.84,528.04 ; 1160.86,522.37 ccw(c1163.67,525.22) 1166.5,522.39 1169.97,525.86 1173.46,529.34 cw(c1182.24,520.56) 1191.03,529.34 cw(c1182.24,520.56) 1194.67,520.56 cw(c1182.24,520.56) 1191.03,511.77 1184.07,504.82 ccw(c1186.9,501.99) 1184.05,499.17 ccw(c1186.9,501.99) 1189.73,499.16 1196.68,506.12 cw(c1205.47,497.33) 1214.25,506.12 cw(c1205.47,497.33) 1217.89,497.33 cw(c1205.47,497.33) 1214.25,488.55 1210.78,485.07 1207.3,481.59 ccw(c1210.12,478.76) 1207.28,475.95 ; 1207.3,475.93 ccw(c1210.12,478.76) 1212.95,475.93 cw(c1219.41,469.47) 1225.87,475.93 1234.8,467 1257.71,467 cw(c1257.71,457.87) 1266.84,457.87 ccw(c1270.84,457.87) 1274.84,457.87 1274.84,468.13 cw(c1286.84,468.13) 1298.84,468.13 1298.84,457.87 ccw(c1302.84,457.87) 1306.84,457.87 1306.84,468.13 cw(c1318.84,468.13) 1330.84,468.13 1330.84,457.87 ccw(c1334.84,457.87) 1338.84,457.87 1338.84,468.13 cw(c1350.84,468.13) 1362.84,468.13 1362.84,467 1392.64,467 1398,472.36 J1.13@1425,472.36
MIPI1_D0_P: J1.12 U*1.35 | length 648.1
  Top1 w4: U*1.35@1060.51,588.39 1084.72,588.39 1100.53,572.57 1123.43,572.57 1133,563 1133,556.89 1143.27,546.62 ccw(c1149.73,553.07) 1156.19,546.62 cw(c1159.01,543.79) 1161.84,546.62 ; 1161.86,546.6 cw(c1159.01,543.79) 1163.01,543.79 cw(c1159.01,543.79) 1161.84,540.96 1154.89,534.01 ccw(c1163.67,525.22) 1154.88,516.43 ccw(c1163.67,525.22) 1172.46,516.43 1175.93,519.9 1179.41,523.39 cw(c1182.24,520.56) 1185.06,523.4 ; 1185.07,523.39 cw(c1182.24,520.56) 1186.24,520.56 cw(c1182.24,520.56) 1185.07,517.73 1178.12,510.78 ccw(c1186.9,501.99) 1178.11,493.2 ccw(c1186.9,501.99) 1195.68,493.2 1202.64,500.16 cw(c1205.47,497.33) 1208.28,500.17 cw(c1205.47,497.33) 1209.47,497.33 cw(c1205.47,497.33) 1208.3,494.5 1204.82,491.02 1201.34,487.55 ccw(c1210.12,478.76) 1201.34,469.97 ccw(c1210.12,478.76) 1218.91,469.97 cw(c1219.41,469.47) 1219.91,469.97 1230.89,459 1257.71,459 cw(c1257.71,457.87) 1258.84,457.87 ccw(c1270.84,457.87) 1282.84,457.87 1282.84,468.13 cw(c1286.84,468.13) 1290.84,468.13 1290.84,457.87 ccw(c1302.84,457.87) 1314.84,457.87 1314.84,468.13 cw(c1318.84,468.13) 1322.84,468.13 1322.84,457.87 ccw(c1334.84,457.87) 1346.84,457.87 1346.84,468.13 cw(c1350.84,468.13) 1354.84,468.13 1354.84,466.16 ccw(c1362,466.16) 1362,459 1391.68,459 1398,452.68 J1.12@1425,452.68